# Altium PCB FR3068E-C_DEV1.4.PcbDoc (part 2 of 2)
Units mm, origin at the board's own origin, x right, y up, seen from the top; angles counter-clockwise.
Board outline 100 x 100 mm, 2 copper layers (Top Layer, Bottom Layer); 190 components, 181 nets, 704 pads, 626 vias.
Unrouted connection lines stored in the file: 147.
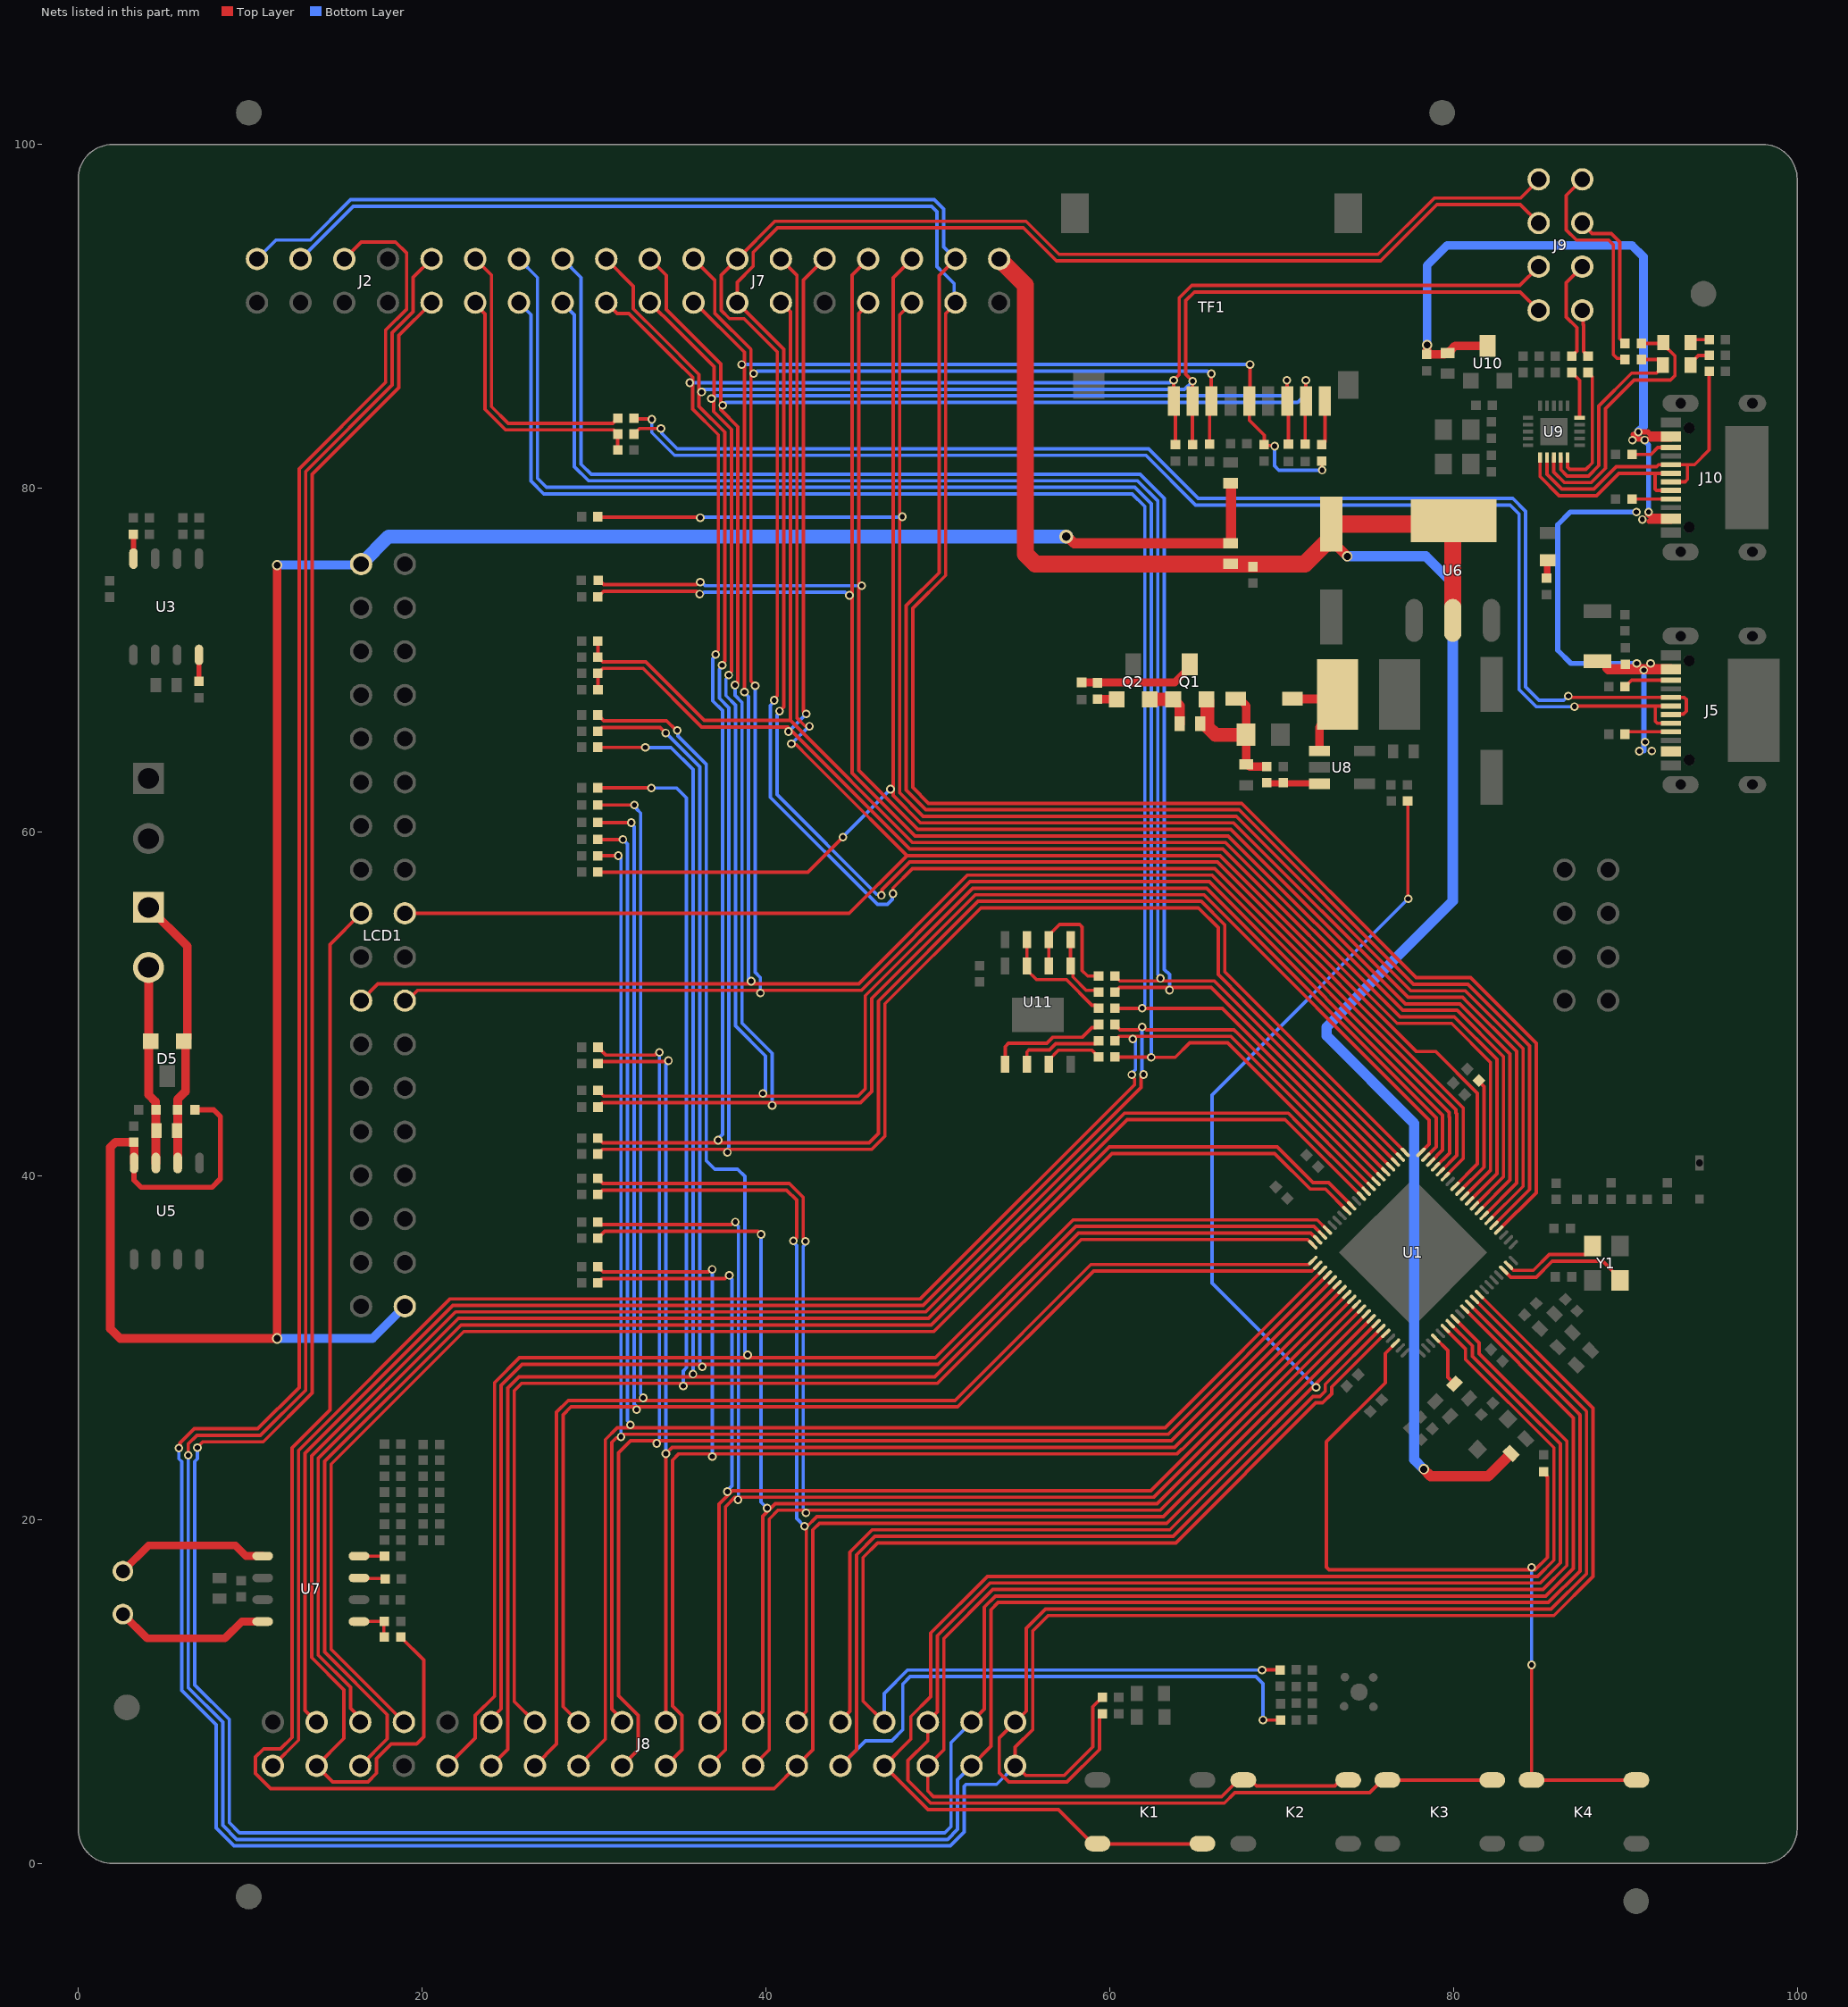
[diagram p2: the nets of this part, all layers, seen from the top]

## Via types
v1: diameter 0.5, hole 0.3, Top Layer to Bottom Layer, tented both sides, 618 vias
v2: diameter 0.6, hole 0.4, Top Layer to Bottom Layer, tented both sides, 7 vias
v3: diameter 0.8, hole 0.5, Top Layer to Bottom Layer, tented both sides, 1 vias

## Nets (pads, with @x,y where several pads share a name; then routed paths per layer and width w, separated by ;. In a path a pad name is that pad's centre, name@x,y a point inside that pad or via, vN(x,y) a via of type N, cw(c..) or ccw(c..) an arc to the next point about the centre after c; other vN are vias at no path point) (continued)
NetD6_1: D6.1 L3.2 U8.1 | length 6.5
  Top Layer w0.5: D6.1@70.65,67.75 73.01,67.75 L3.2@73.27,68.01 73.27,67.16 72.21,66.1 U8.1@72.21,64.72
NetD9_1: D9.1 R50.1 | length 1.1
  Top Layer w0.2: D9.1@93.81,88.483 93.973,88.646 R50.1@94.887,88.646
NetD10_1: D10.1 R51.1 | length 1.4
  Top Layer w0.2: D10.1@93.793,87.174 93.793,87.274 94.25,87.731 R51.1@94.887,87.731
NetD12_1: D12.1 R35.1 | length 1.1
  Top Layer w0.4: R35.1@85.424,74.765 85.454,74.795 85.454,75.778 D12.1@85.483,75.808
NetJ5_A5: J5.A5 R42.2 | length 2.7
  Top Layer w0.2: R42.2@89.989,65.695 90.128,65.834 J5.A5@92.653,65.834
NetJ5_A6: J5.A6 J5.B6 R49.2 | length 75.9
  Top Layer w0.2: R49.2@32.336,83.152 32.66,83.477 v1@33.902,83.477 ; v1(86.69,67.91) 86.771,67.91 86.847,67.834 J5.B6@92.653,67.834 93.432,67.834 93.549,67.717 93.549,67.03 93.38,66.861 92.68,66.861 J5.A6@92.653,66.834
  Bottom Layer w0.2: v1(33.902,83.475) 33.96,83.417 33.96,83.191 34.851,82.299 62.274,82.299 65.165,79.409 83.459,79.409 84.201,78.666 84.201,68.454 84.984,67.67 86.423,67.67 86.662,67.91 v1(86.69,67.91)
NetJ5_A7: J5.A7 J5.B7 R48.2 | length 75.5
  Top Layer w0.2: R48.2@32.336,84.072 32.367,84.041 33.339,84.041 v1(33.37,84.01) ; v1@87.042,67.334 J5.A7@92.653,67.334 ; 91.75,67.28 91.75,66.455 91.871,66.334 J5.B7@92.653,66.334
  Bottom Layer w0.2: v1(33.37,84.01) 33.368,84.008 33.368,83.245 34.694,81.919 62.117,81.919 65.007,79.029 83.302,79.029 83.821,78.509 83.821,68.296 84.827,67.29 87.034,67.29 v1(87.042,67.298)
NetJ5_B5: J5.B5 R44.2 | length 2.8
  Top Layer w0.2: R44.2@89.989,68.452 90.371,68.834 J5.B5@92.653,68.834
NetJ9_1: J9.1 R52.1 | length 13.6
  Top Layer w0.2: J9.1@87.504,97.973 86.574,97.043 86.574,95.032 87.165,94.441 89.032,94.441 89.31,94.163 89.31,87.773 89.527,87.556 89.92,87.556 R52.1@89.985,87.492
NetJ9_3: J9.3 R53.1 | length 8.7
  Top Layer w0.2: J9.3@87.504,95.433 87.504,95.387 88.07,94.821 89.189,94.821 89.69,94.321 89.69,88.722 R53.1@89.983,88.429
NetJ9_5: J9.5 R54.1 | length 6
  Top Layer w0.2: R54.1@86.893,87.69 87.195,87.992 87.195,89.347 86.574,89.968 86.574,91.963 J9.5@87.504,92.893
NetJ9_7: J9.7 R55.1 | length 2.8
  Top Layer w0.2: J9.7@87.504,90.353 87.559,90.298 87.559,89.52 87.575,89.505 87.575,87.955 R55.1@87.841,87.69
NetJ10_A5: J10.A5 R9.2 | length 2.3
  Top Layer w0.2: R9.2@90.393,79.268 90.499,79.374 J10.A5@92.653,79.374
NetJ10_B5: J10.B5 R13.2 | length 2.4
  Top Layer w0.2: R13.2@90.395,81.97 91.497,81.97 91.9,82.373 92.652,82.373 J10.B5@92.653,82.374
NetL2_2: L2.2 U1.64 | length 3.1
  Top Layer w0.2: U1.64@78.967,30.554 79.688,29.833 79.688,28.28 L2.2@80.064,27.904
NetQ1_1: Q1.1 Q2.2 R91.1 | length 2.9
  Top Layer w0.6: Q1.1@63.701,67.721 64.084,67.338 R91.1@64.084,66.301
  Top Layer w0.8: Q2.2@62.349,67.721 Q1.1@63.701,67.721
NetQ1_3: Q1.3 R15.2 R92.1 | length 6.8
  Top Layer w0.25: R15.2@58.374,68.709 R15.2@58.387,68.696
  Top Layer w0.45: R15.2@58.374,68.709 63.799,68.709 64.666,69.575 Q1.3@64.666,69.753
NetQ2_1: Q2.1 R92.2 | length 1.1
  Top Layer w0.5: R92.2@59.301,67.734 59.307,67.727 60.412,67.727 Q2.1@60.418,67.721
NetR6_2: R6.2 U1.12 | length 7.1
  Top Layer w0.2: U1.12@80.382,39.11 81.778,40.506 81.778,45.189 81.485,45.481 R6.2@81.485,45.544
NetR26_2: R26.2 U3.8 | length 1.5
  Top Layer w0.3: U3.8@7.026,70.309 7.027,70.308 R26.2@7.028,68.772 R26.2@7.028,68.772
NetR31_1: R31.1 U3.4 | length 1.4
  Top Layer w0.3: U3.4@3.216,75.909 3.219,75.913 3.219,77.28 R31.1@3.223,77.284
NetR40_2: R40.2 U7.3 | length 1.5
  Top Layer w0.2: U7.3@16.335,16.613 16.367,16.58 17.792,16.58 R40.2@17.825,16.548
NetR41_2: R41.2 U7.4 | length 1.5
  Top Layer w0.2: U7.4@16.335,17.883 16.342,17.875 17.787,17.875 R41.2@17.795,17.868
NetR46_1: R46.1 R47.2 U8.3 | length 3.1
  Top Layer w0.35: R46.1@69.15,62.865 69.172,62.842 72.187,62.842 U8.3@72.21,62.82
NetU1_78: U1.78 Y1.1 | length 7.8
  Top Layer w0.2: U1.78@82.927,34.513 83.338,34.102 84.82,34.102 85.748,35.03 88.698,35.03 89.698,34.03 Y1.1@89.698,33.93
NetU1_79: U1.79 Y1.3 | length 5.7
  Top Layer w0.2: U1.79@83.21,34.796 83.504,34.502 84.655,34.502 85.582,35.43 87.698,35.43 88.098,35.83 Y1.3@88.098,35.93
PA0/RX: D10.2 R52.2 U9.9 | length 13
  Top Layer w0.2: U9.9@86.246,81.8 86.246,81.089 86.621,80.714 87.857,80.714 88.466,81.322 88.466,84.795 90.372,86.702 91.822,86.702 92.193,87.074 92.193,87.242 91.943,87.492 R52.2@90.935,87.492
PA1/TX: D9.2 R53.2 U9.8 | length 16.2
  Top Layer w0.2: U9.8@85.846,81.8 85.846,80.951 86.464,80.334 88.015,80.334 88.85,81.169 88.85,83.096 ; 88.846,83.096 88.846,84.638 90.509,86.301 92.631,86.301 92.895,86.565 92.895,87.698 D9.2@92.21,88.383 ; R53.2@90.933,88.429 92.156,88.429 D9.2@92.21,88.483
PA4: J2.10 J8.4 U1.70 | length 205.9
  Top Layer w0.2: v1(6.936,24.187) 6.936,24.222 7.245,24.531 10.765,24.531 13.612,27.378 13.612,80.812 18.649,85.848 18.649,88.889 J2.10@20.56,90.8 ; J8.4@51.97,8.223 52.721,8.974 52.721,14.916 53.364,15.559 85.377,15.559 86.988,17.171 86.988,25.927 U1.70@80.664,32.251
  Bottom Layer w0.2: v1(6.936,24.187) 6.936,23.539 6.779,23.383 6.779,10.389 8.793,8.376 8.793,2.374 9.386,1.78 50.416,1.78 50.777,2.142 50.777,7.03 J8.4@51.97,8.223
PA4/USB_DP: J10.A6 J10.B6 R56.2 U9.7 | length 18.2
  Top Layer w0.2: U9.7@85.446,81.8 85.446,80.814 86.306,79.954 88.172,79.954 89.472,81.254 91.819,81.254 91.939,81.374 J10.B6@92.653,81.374 94.033,81.374 94.887,82.228 R56.2@94.887,86.807 ; J10.A6@92.653,80.374 93.473,80.374 93.617,80.517 93.617,81.37
PA5: J2.9 J8.3 U1.71 | length 210.3
  Top Layer w0.2: v1(6.399,23.752) 6.399,24.408 6.902,24.911 10.608,24.911 13.232,27.535 13.232,80.969 18.269,86.006 18.269,89.046 19.49,90.268 19.49,92.27 J2.9@20.56,93.34 ; J8.3@51.97,5.683 53.101,6.814 53.101,14.759 53.522,15.179 85.534,15.179 87.368,17.013 87.368,26.084 87.348,26.104 87.348,26.133 81.241,32.239 U1.71@80.947,32.533
  Bottom Layer w0.2: v1(6.399,23.752) 6.399,10.232 8.413,8.219 8.413,2.216 9.229,1.4 50.573,1.4 51.157,1.984 51.157,4.87 J8.3@51.97,5.683
PA5/USB_DM: J10.A7 J10.B7 U9.6 | length 11.6
  Top Layer w0.2: U9.6@85.046,81.8 85.046,80.676 86.149,79.574 88.33,79.574 89.63,80.874 91.752,80.874 ; J10.B7@92.653,79.874 91.815,79.874 91.737,79.952 91.737,80.858 91.752,80.874 ; J10.A7@92.653,80.874 91.752,80.874
PA6: J8.2 R7.2 U1.72 | length 70.6
  Top Layer w0.2: R7.2@59.584,8.716 59.409,8.541 59.409,6.627 57.525,4.743 54.134,4.743 53.58,5.297 53.58,7.293 55.15,8.863 55.15,13.682 56.267,14.799 85.691,14.799 87.748,16.856 87.748,26.298 U1.72@81.23,32.816
PA7: J2.5 J8.1 R8.2 U1.73 | length 224.8
  Top Layer w0.2: v1(5.86,24.17) 5.917,24.227 5.917,24.463 6.745,25.291 10.45,25.291 12.852,27.692 12.852,81.126 17.889,86.163 17.889,89.204 19.11,90.425 19.11,93.677 18.46,94.327 16.467,94.327 J2.5@15.48,93.34 ; R8.2@59.584,9.673 59.029,9.118 59.029,6.785 57.367,5.123 55.128,5.123 54.569,5.683 J8.1@54.51,5.683 54.51,6.766 55.53,7.786 55.53,13.524 56.424,14.419 85.849,14.419 88.128,16.698 88.128,26.484 87.988,26.624 U1.73@81.513,33.099
  Bottom Layer w0.2: v1(5.86,24.17) 5.86,23.542 6.019,23.383 6.019,10.075 8.033,8.061 8.033,2.059 9.071,1.02 50.731,1.02 51.537,1.827 51.537,4.485 51.654,4.603 53.43,4.603 J8.1@54.51,5.683
PA10: J2.3 J7.3 U1.4 | length 127.6
  Top Layer w0.2: J7.3@51.04,90.8 51.04,90.743 50.464,90.167 50.464,74.93 48.549,73.015 48.549,62.599 49.472,61.675 67.691,61.675 77.836,51.53 81.004,51.53 84.818,47.717 84.818,39.02 U1.4@82.644,36.847
  Bottom Layer w0.2: J2.3@12.94,93.34 16.005,96.405 49.639,96.405 49.96,96.084 49.96,92.893 50.362,92.49 50.367,92.49 50.958,91.9 50.958,90.882 J7.3@51.04,90.8
PA11: J2.1 J7.4 U1.5 | length 130.6
  Top Layer w0.2: J7.4@51.04,93.34 50.084,92.384 50.084,75.088 48.169,73.173 48.169,62.442 49.315,61.295 67.533,61.295 77.679,51.15 80.847,51.15 84.438,47.559 84.438,39.206 U1.5@82.361,37.13
  Bottom Layer w0.2: J2.1@10.4,93.34 11.503,94.443 13.505,94.443 15.848,96.785 49.796,96.785 50.34,96.241 50.34,94.04 J7.4@51.04,93.34
PA12: J7.5 R69.1 U1.6 | length 99.9
  Top Layer w0.2: R69.1@30.235,78.346 30.264,78.318 36.159,78.318 v1(36.188,78.289) ; J7.5@48.5,90.8 47.789,90.089 47.789,62.284 49.158,60.915 67.376,60.915 77.521,50.77 80.689,50.77 84.058,47.402 84.058,39.392 U1.6@82.079,37.412
  Bottom Layer w0.2: v1(36.188,78.289) 36.218,78.319 47.985,78.319 v1@48.011,78.345
  other v1: 47.94,78.35
PA13: J7.6 R78.2 U1.7 | length 103.5
  Top Layer w0.2: R78.2@30.235,57.67 42.454,57.67 44.484,59.7 v1(44.484,59.708) ; J7.6@48.5,93.34 47.409,92.249 47.409,62.127 49,60.535 67.219,60.535 77.364,50.39 80.532,50.39 80.805,50.117 83.678,47.244 83.678,39.577 U1.7@81.796,37.695
  Bottom Layer w0.2: v1(44.484,59.708) 44.484,59.718 47.256,62.49 v1(47.256,62.5)
PA14: J7.7 R14.1 U1.8 | length 97.6
  Top Layer w0.2: R14.1@30.301,74.678 30.584,74.395 35.963,74.395 36.105,74.538 v1(36.186,74.538) ; J7.7@45.96,90.8 45.96,90.722 45.41,90.172 45.41,63.588 48.843,60.155 67.061,60.155 77.206,50.01 80.375,50.01 83.298,47.087 83.298,39.763 U1.8@81.513,37.978
  Bottom Layer w0.2: v1(36.186,74.538) 36.267,74.538 36.474,74.332 v1(45.581,74.332) v1@45.583,74.333
PA15: J7.8 R3.1 U1.9 | length 99.3
  Top Layer w0.2: R3.1@30.276,73.725 30.567,74.015 35.99,74.015 v1(36.158,73.848) ; J7.8@45.96,93.34 45.03,92.41 45.03,63.431 48.685,59.775 66.904,59.775 77.049,49.63 80.217,49.63 82.918,46.93 82.918,39.949 U1.9@81.23,38.261
  Bottom Layer w0.2: v1(36.158,73.848) 36.215,73.905 36.379,73.905 36.425,73.952 44.611,73.952 44.785,73.778 v1(44.866,73.778)
PA_EN: R20.2 R43.2 U7.1 | length 2.3
  Top Layer w0.2: U7.1@16.335,14.073 16.342,14.08 17.777,14.08 17.785,14.088 R20.2@17.785,13.198
PB0: J7.11 R2.2 R34.1 U1.10 | length 96.4
  Top Layer w0.2: R34.1@30.237,71.103 30.237,70.184 R2.2@30.235,70.182 30.514,69.903 33.02,69.903 36.43,66.493 41.43,66.493 ; J7.11@40.88,90.8 40.898,90.8 41.43,90.268 41.43,66.493 ; U1.10@80.947,38.544 82.538,40.135 82.538,46.772 80.06,49.25 76.892,49.25 66.746,59.395 48.528,59.395 41.43,66.493
PB1: J7.10 R4.2 R58.1 U1.11 | length 99.2
  Top Layer w0.2: R58.1@30.239,68.283 30.235,68.286 R4.2@30.235,69.237 30.522,69.523 32.863,69.523 36.273,66.113 41.273,66.113 48.371,59.015 66.589,59.015 76.734,48.87 79.902,48.87 82.158,46.615 82.158,40.32 U1.11@80.664,38.827 ; v1@42.19,67.025 42.19,92.11 J7.10@43.42,93.34
  Bottom Layer w0.2: v1@41.31,65.816 41.31,65.826 42.351,66.868 v1(42.351,66.878)
  other v1: 41.32,65.85
PB3: J7.12 LCD1.17 U1.13 | length 114.3
  Top Layer w0.2: LCD1.17@19,55.273 44.85,55.273 48.213,58.635 ; J7.12@40.88,93.34 41.81,92.41 41.81,66.651 v1@42.31,66.151 ; v1(41.49,65.14) 41.547,65.083 41.766,65.083 42.492,64.357 43.869,62.98 48.213,58.635 ; v1(42.538,66.159) 42.564,66.133 v1@42.643,66.133 ; U1.13@80.099,39.392 81.398,40.692 81.398,44.806 78.966,47.239 77.828,47.239 66.432,58.635 48.213,58.635
  Bottom Layer w0.2: v1(41.49,65.14) 41.504,65.14 42.523,66.159 v1(42.538,66.159)
PB4: J7.13 J9.4 U1.15 | length 135.8
  Top Layer w0.2: v1(40.802,67.039) 41.05,67.287 41.05,88.09 J7.13@38.34,90.8 38.34,91.996 39.27,92.926 39.27,93.733 40.688,95.151 54.986,95.151 56.908,93.229 75.773,93.229 79.045,96.501 83.897,96.501 J9.4@84.964,95.433 ; v1(46.721,56.322) 46.768,56.37 46.768,56.653 48.371,58.255 49.792,58.255 66,58.255 66.274,58.255 80.578,43.952 80.578,43.677 80.579,43.676 80.579,41.004 U1.15@79.533,39.958
  Bottom Layer w0.2: v1(40.802,67.039) 40.802,66.958 40.652,66.808 40.652,62.179 46.451,56.38 46.663,56.38 v1(46.721,56.322)
PB5: J7.14 J9.2 U1.16 | length 137.4
  Top Layer w0.2: v1(40.49,67.67) 40.49,67.751 40.67,67.931 40.67,87.933 38.733,89.87 37.887,89.87 37.41,90.348 37.41,92.41 J7.14@38.34,93.34 40.531,95.531 55.144,95.531 57.066,93.609 75.616,93.609 78.888,96.881 83.902,96.881 84.964,97.943 J9.2@84.964,97.973 ; v1(47.399,56.417) 47.397,56.418 47.397,56.745 48.528,57.875 66.117,57.875 80.156,43.837 80.156,43.668 80.198,43.625 80.198,41.189 U1.16@79.25,40.241
  Bottom Layer w0.2: v1(40.49,67.67) 40.49,67.589 40.272,67.371 40.272,62.021 46.501,55.792 47.083,55.792 47.364,56.073 47.364,56.383 v1(47.399,56.417)
PB6: J7.15 LCD1.22 R22.1 R23.2 TF1.5 U1.17 | length 156.1
  Top Layer w0.2: LCD1.22@16.46,50.193 17.439,51.172 45.405,51.172 51.728,57.495 65.959,57.495 79.758,43.697 79.758,43.431 79.776,43.413 79.776,41.332 U1.17@78.967,40.524 ; J7.15@35.8,90.8 35.883,90.8 38.76,87.923 38.76,68.322 v1@38.762,68.32 ; v1(68.17,87.2) 68.17,85.121 TF1.5@68.13,85.081 68.13,83.958 69,83.088 R22.1@69,82.534 69.041,82.493 69.563,82.493 v1(69.604,82.452) ; R23.2@72.349,81.584 72.355,81.578 72.355,81.061 v1(72.362,81.055)
  Bottom Layer w0.2: v1@38.523,87.197 38.526,87.2 39.51,87.2 ; v1(38.76,68.15) 38.76,68.13 39,67.89 v1@39,51.352 ; 39.51,87.2 v1(68.17,87.2) ; v1(69.604,82.452) 69.604,81.3 69.849,81.055 v1(72.362,81.055)
  other v1: 39.15,51.33 38.6,87.2
PB7: J7.16 LCD1.21 R16.1 TF1.3 U1.18 | length 147.1
  Top Layer w0.2: LCD1.21@19,50.193 19.145,50.193 19.744,50.792 45.562,50.792 51.886,57.115 65.802,57.115 79.378,43.54 79.378,41.5 U1.18@78.685,40.807 ; J7.16@35.8,93.34 37.03,92.11 37.03,90.19 39.14,88.08 39.14,68.779 39.383,68.536 v1(39.383,68.512) ; R16.1@65.823,82.563 65.823,84.974 TF1.3@65.93,85.081 65.92,85.092 v1(65.92,86.66)
  Bottom Layer w0.2: v1(39.29,86.67) 39.371,86.67 39.521,86.82 65.679,86.82 65.839,86.66 v1(65.92,86.66) ; v1@39.38,68.509 39.38,51.85 39.68,51.55 39.68,50.687 v1@39.685,50.682
  other v1: 39.69,50.64
PB8: J7.17 R19.1 R82.2 TF1.7 U1.19 | length 151.8
  Top Layer w0.2: R82.2@30.238,44.965 30.569,44.634 45.359,44.634 45.792,45.067 45.792,50.484 52.043,56.735 65.645,56.735 78.998,43.382 78.998,41.686 U1.19@78.402,41.089 ; J7.17@33.26,90.8 34.755,89.305 34.762,89.305 36.998,87.069 v1@36.998,85.326 ; v1@36.962,85.22 36.962,84.464 38,83.427 38,69.366 ; v1(70.32,86.28) 70.32,85.092 70.405,85.007 R19.1@70.405,82.559
  Bottom Layer w0.2: v1(36.84,85.22) 36.921,85.22 37.082,85.38 48.829,85.38 70.135,85.38 70.32,85.565 v1(70.32,86.28) ; 37.68,68.884 37.68,67.943 38.24,67.383 38.24,48.725 39.988,46.977 39.988,44.818 v1@39.844,44.674
  other v1: 39.83,44.79 37.847,69.132
PB9: J7.18 R24.1 R81.1 TF1.8 U1.20 | length 155.2
  Top Layer w0.2: R81.1@30.238,44 30.493,44.254 45.516,44.254 46.172,44.91 46.172,50.327 52.201,56.355 65.487,56.355 78.598,43.245 78.598,41.851 U1.20@78.119,41.372 ; J7.18@33.26,93.34 34.212,92.388 34.212,90.393 37.378,87.227 37.378,84.585 38.38,83.584 38.38,68.673 v1@38.28,68.574 ; R24.1@71.377,82.559 71.377,85.08 71.42,85.123 v1(71.42,86.28)
  Bottom Layer w0.2: v1(37.492,84.827) 37.665,85 70.942,85 71.42,85.478 v1(71.42,86.28) ; v1(38.21,68.55) 38.21,67.95 38.62,67.54 38.62,48.882 40.368,47.135 v1@40.368,44.032
  other v1: 40.37,44.1
PB10: J7.19 J9.6 R29.1 R84.2 TF1.1 U1.21 | length 175.9
  Top Layer w0.2: R84.2@30.235,42.202 30.514,41.922 46.007,41.922 46.552,42.468 46.552,50.169 52.358,55.975 65.33,55.975 66.706,54.599 66.706,51.866 U1.21@77.2,41.372 ; J7.19@30.72,90.8 31.354,90.166 32.041,90.166 34.709,87.498 35.74,86.467 35.74,84.611 37.24,83.112 37.24,70.563 37.089,70.412 v1(37.089,70.331) ; R29.1@63.834,82.538 63.834,84.978 TF1.1@63.73,85.081 v1(63.73,86.29) 64.052,86.611 64.052,91.072 64.778,91.799 83.87,91.799 J9.6@84.964,92.893
  Bottom Layer w0.2: v1(35.581,86.14) 63.499,86.14 63.649,86.29 v1(63.73,86.29) ; v1(37.089,70.331) 37.089,70.25 36.92,70.081 36.92,67.628 37.48,67.068 37.48,42.411 37.23,42.161 v1(37.23,42.08)
PB11: J7.20 J9.8 R30.1 R83.1 TF1.2 U1.22 | length 178.5
  Top Layer w0.2: R83.1@30.235,41.274 30.504,41.542 46.164,41.542 46.932,42.31 46.932,50.012 52.515,55.595 65.172,55.595 66.326,54.442 66.326,51.708 67.816,50.218 67.816,50.19 U1.22@76.917,41.089 ; J7.20@30.72,93.34 32.301,91.759 32.301,90.444 33.836,88.909 36.12,86.625 36.12,84.769 37.62,83.269 37.62,69.951 37.46,69.791 v1(37.46,69.71) ; R30.1@64.828,82.538 TF1.2@64.828,85.08 ; TF1.2@64.83,85.081 v1(64.83,86.23) 64.432,86.628 64.432,90.915 64.935,91.419 83.899,91.419 J9.8@84.964,90.353
  Bottom Layer w0.2: v1@36.27,85.76 64.36,85.76 v1(64.83,86.23) ; v1(37.46,69.71) 37.46,69.629 37.3,69.469 37.3,67.786 37.86,67.226 37.86,41.637 37.827,41.605 37.827,41.427 v1(37.77,41.37)
  other v1: 36.27,85.6
PB12: J7.21 R36.2 U1.23 | length 93.2
  Top Layer w0.2: R36.2@60.313,51.625 60.598,51.34 66.101,51.34 U1.23@76.634,40.807
  Bottom Layer w0.2: J7.21@28.18,90.8 28.18,90.78 28.865,90.095 28.865,81.261 29.686,80.439 61.63,80.439 62.81,79.259 62.81,51.721 62.96,51.571 v1(62.96,51.49)
PB13: J7.22 R60.2 U1.24 | length 96.3
  Top Layer w0.2: R60.2@60.313,50.685 60.588,50.96 65.915,50.96 U1.24@76.351,40.524
  Bottom Layer w0.2: J7.22@28.18,93.34 29.26,92.26 29.26,81.403 29.844,80.819 61.788,80.819 63.19,79.417 63.19,52.01 63.49,51.71 v1(63.49,50.81)
PB14: J7.23 R61.2 U1.25 | length 95.9
  Top Layer w0.2: R61.2@60.313,49.745 66.564,49.745 U1.25@76.068,40.241
  Bottom Layer w0.2: J7.23@25.64,90.8 26.34,90.1 26.34,80.422 27.083,79.679 61.315,79.679 62.05,78.945 62.05,49.934 61.9,49.784 v1(61.9,49.75)
PB15: J7.24 R62.2 U1.28 | length 100.5
  Top Layer w0.2: R62.2@60.308,46.92 60.317,46.911 62.409,46.911 v1(62.423,46.897) 63.817,46.897 64.66,47.74 66.872,47.74 70.17,44.442 U1.28@75.22,39.392
  Bottom Layer w0.2: J7.24@25.64,93.34 26.72,92.26 26.72,80.58 27.241,80.059 61.473,80.059 62.43,79.102 62.43,46.904 v1(62.423,46.897)
PC0: J8.35 R63.2 U1.27 | length 98.1
  Top Layer w0.2: J8.35@11.33,5.683 12.819,7.172 12.819,24.019 21.646,32.846 48.994,32.846 61.455,45.307 61.455,45.643 61.29,45.809 v1(61.29,45.89) ; R63.2@60.313,47.865 60.568,48.12 67.058,48.12 U1.27@75.503,39.675
  Bottom Layer w0.2: v1(61.29,45.89) 61.29,45.961 61.509,46.18 61.509,47.916 v1@61.386,48.039
  other v1: 61.35,47.96
PC1: J8.34 R64.2 U1.26 | length 96.2
  Top Layer w0.2: J8.34@13.87,8.223 13.87,8.225 13.199,8.895 13.199,23.861 21.803,32.466 49.151,32.466 61.835,45.15 61.835,45.757 v1(61.978,45.899) ; R64.2@60.313,48.805 60.618,48.5 61.659,48.5 v1@61.819,48.66 ; v1(61.9,48.66) 61.981,48.66 62.141,48.5 67.243,48.5 67.483,48.261 U1.26@75.785,39.958
  Bottom Layer w0.2: v1(61.9,48.66) 61.889,48.649 61.889,46.069 61.978,45.981 v1(61.978,45.899)
PC2: J8.33 R20.1 U1.29 | length 105.5
  Top Layer w0.2: R20.1@18.76,13.174 20.098,11.836 20.098,7.369 19.682,6.953 18.217,6.953 17.357,6.093 17.357,5.247 16.853,4.743 14.809,4.743 J8.33@13.87,5.683 15.462,7.275 15.462,10.098 13.579,11.981 13.579,12.718 13.579,23.704 21.961,32.086 49.308,32.086 60.873,43.65 70.396,43.65 70.951,43.096 U1.29@74.937,39.11
PC3: J8.32 U1.30 | length 87
  Top Layer w0.2: J8.32@16.41,8.223 16.41,8.459 15.842,9.027 15.842,10.256 13.959,12.138 13.959,23.546 22.118,31.706 49.466,31.706 61.03,43.27 70.211,43.27 U1.30@74.654,38.827
PC4: J8.31 U1.32 | length 88.6
  Top Layer w0.2: J8.31@16.41,5.683 17.978,7.251 17.978,8.657 14.339,12.296 14.339,23.389 22.276,31.326 49.623,31.326 59.985,41.688 69.76,41.688 71.838,39.61 72.739,39.61 U1.32@74.088,38.261
PC5: J8.30 U1.33 | length 84.7
  Top Layer w0.2: J8.30@18.95,8.223 14.719,12.453 14.719,23.232 22.433,30.946 49.781,30.946 60.142,41.308 69.603,41.308 71.681,39.23 72.554,39.23 U1.33@73.806,37.978
PC7/SWDIO: R55.2 U9.10 | length 7.6
  Top Layer w0.2: U9.10@86.646,81.8 86.646,81.226 86.778,81.094 87.7,81.094 88.086,81.48 88.086,86.495 R55.2@87.841,86.74
PD0: J8.27 R70.2 U1.37 | length 119.8
  Top Layer w0.2: J8.27@21.49,5.683 23.1,7.293 23.1,8.608 24.226,9.734 24.226,27.975 25.674,29.422 49.87,29.422 57.887,37.44 72.081,37.44 U1.37@72.674,36.847 ; R70.2@30.235,66.81 30.572,66.473 34.227,66.473 34.779,65.921 v1(34.851,65.921)
  Bottom Layer w0.2: v1(34.851,65.921) 34.898,65.874 34.898,65.59 36.536,63.952 36.536,40.893 37.031,40.398 38.357,40.398 38.79,39.965 38.79,29.755 38.94,29.605 v1(38.94,29.58)
PD1: J8.26 R71.1 U1.38 | length 113.5
  Top Layer w0.2: J8.26@24.03,8.223 24.03,8.414 24.606,8.99 24.606,27.817 25.831,29.042 50.027,29.042 58.045,37.06 71.895,37.06 U1.38@72.391,36.564 ; R71.1@30.235,65.867 30.461,66.093 33.86,66.093 34.182,65.771 v1(34.182,65.769)
  Bottom Layer w0.2: v1(34.182,65.769) 36.156,63.795 36.156,29.098 v1@36.311,28.943
  other v1: 36.31,28.89
PD2: J8.25 R72.2 U1.39 | length 114.6
  Top Layer w0.2: J8.25@24.03,5.683 24.986,6.639 24.986,27.654 25.643,28.311 49.833,28.311 58.202,36.68 71.71,36.68 U1.39@72.108,36.281 ; R72.2@30.235,64.941 30.244,64.932 32.988,64.932 v1(32.997,64.923)
  Bottom Layer w0.2: v1(32.997,64.923) 34.491,64.923 35.77,63.643 v1(35.77,28.47)
PD3: J8.24 R73.1 U1.40 | length 109.7
  Top Layer w0.2: J8.24@26.57,8.223 25.366,9.426 25.366,27.497 25.801,27.931 35.23,27.931 49.991,27.931 58.359,36.3 71.524,36.3 U1.40@71.826,35.998 ; R73.1@30.235,62.575 30.24,62.57 33.345,62.57 v1(33.35,62.565)
  Bottom Layer w0.2: J8.24@26.57,8.223 J8.24@26.63,8.223 ; v1(33.35,62.565) 34.817,62.565 35.39,61.992 35.39,28.84 35.197,28.647 v1@35.197,27.819
  other v1: 35.203,27.781
PD4: J8.23 R74.2 U1.41 | length 105.6
  Top Layer w0.2: J8.23@26.57,5.683 27.831,6.944 27.831,26.26 28.512,26.94 32.87,26.94 51.011,26.94 58.911,34.84 71.587,34.84 U1.41@71.826,35.079 ; R74.2@30.235,61.579 v1(32.36,61.579)
  Bottom Layer w0.2: v1(32.36,61.579) 32.36,61.498 32.494,61.364 32.494,61.336 32.72,61.11 32.72,27.321 32.87,27.171 v1(32.87,27.09)
PD5: J8.22 R75.1 U1.42 | length 102
  Top Layer w0.2: J8.22@29.11,8.223 28.211,9.121 28.211,26.102 28.669,26.56 32.49,26.56 51.169,26.56 59.069,34.46 71.772,34.46 U1.42@72.108,34.796 ; R75.1@30.235,60.568 30.244,60.559 32.171,60.559 v1(32.18,60.55)
  Bottom Layer w0.2: J8.22@28.9,8.223 J8.22@29.11,8.223 ; v1(32.18,60.55) 32.18,60.469 32.34,60.309 32.34,59.458 32.34,27.164 32.34,26.72 v1@32.5,26.56
  other v1: 32.49,26.4
PD6: J8.21 R76.2 U1.43 | length 101.1
  Top Layer w0.2: J8.21@29.11,5.683 30.67,7.243 30.67,24.659 31.36,25.35 32.13,25.35 63.228,25.35 U1.43@72.391,34.513 ; R76.2@30.235,59.572 30.236,59.571 31.689,59.571 v1(31.69,59.57)
  Bottom Layer w0.2: v1(31.69,59.57) 31.96,59.3 31.96,25.751 32.12,25.591 v1(32.12,25.51)
PD7: J8.20 R77.1 U1.44 | length 97.2
  Top Layer w0.2: R77.1@30.235,58.62 30.24,58.625 31.415,58.625 v1(31.42,58.63) ; v1(31.58,24.82) 31.523,24.763 31.31,24.763 31.05,24.502 31.05,8.98 31.65,8.38 J8.20@31.65,8.223 ; v1@31.58,24.97 32.5,24.97 63.414,24.97 U1.44@72.674,34.23
  Bottom Layer w0.2: v1(31.42,58.63) 31.43,58.63 31.58,58.48 v1(31.58,24.82)
PD7/SWCLK: R54.2 U9.15 | length 2.8
  Top Layer w0.2: R54.2@86.893,86.74 87.346,86.287 U9.15@87.346,84.1
PD8: J8.19 R80.2 U1.45 | length 91.4
  Top Layer w0.2: R80.2@30.238,47.483 30.623,47.098 30.629,47.098 30.703,47.024 33.543,47.024 33.642,47.123 33.753,47.123 v1(33.81,47.18) ; J8.19@31.65,5.683 32.58,6.613 32.58,8.613 31.43,9.763 31.43,23.887 32.132,24.59 33.347,24.59 63.599,24.59 U1.45@72.957,33.948
  Bottom Layer w0.2: v1(33.66,24.44) 33.66,24.521 33.81,24.671 33.81,24.707 ; 33.81,24.707 v1(33.81,47.18)
PD9: J8.18 R79.1 U1.46 | length 85.8
  Top Layer w0.2: R79.1@30.238,46.543 30.338,46.644 34.284,46.644 v1(34.34,46.7) ; J8.18@34.19,8.223 v1(34.19,23.84) 34.56,24.21 63.785,24.21 U1.46@73.24,33.665
  Bottom Layer w0.2: v1(34.19,23.84) 34.189,23.841 34.189,24.219 34.19,24.22 34.19,24.66 34.19,46.433 34.19,46.469 34.34,46.619 v1(34.34,46.7)
PD10: J8.17 R89.2 U1.47 | length 79.1
  Top Layer w0.2: R89.2@30.235,34.71 30.535,34.41 36.65,34.41 36.805,34.565 v1(36.886,34.565) ; J8.17@34.19,5.683 35.12,6.613 35.12,8.608 34.57,9.158 34.57,23.462 34.938,23.83 63.942,23.83 64.206,24.093 64.234,24.093 U1.47@73.523,33.382
  Bottom Layer w0.2: v1@36.886,23.756 v1(36.886,34.565)
  other v1: 36.89,23.67
PD11: J8.16 R90.1 U1.48 | length 75.1
  Top Layer w0.2: R90.1@30.235,33.782 30.483,34.03 37.613,34.03 37.736,34.153 37.823,34.153 v1(37.88,34.21) ; J8.16@36.73,8.223 36.73,8.3 37.28,8.85 37.28,20.909 38.06,21.69 62.397,21.69 U1.48@73.806,33.099
  Bottom Layer w0.2: v1(37.768,21.634) 37.768,21.715 38.03,21.977 38.03,33.979 37.88,34.129 v1(37.88,34.21)
PD12: J8.15 R87.2 U1.49 | length 81.2
  Top Layer w0.2: R87.2@30.235,37.31 30.381,37.164 37.993,37.164 38.149,37.32 v1(38.23,37.32) ; J8.15@36.73,5.683 37.66,6.613 37.66,20.752 38.218,21.31 62.582,21.31 68.822,27.55 U1.49@74.088,32.816
  Bottom Layer w0.2: v1(38.23,37.32) 38.23,37.239 38.41,37.059 38.41,21.19 v1(38.38,21.16)
PD13: J8.14 R88.1 U1.50 | length 77.7
  Top Layer w0.2: R88.1@30.235,36.384 30.635,36.784 39.541,36.784 v1(39.726,36.599) ; J8.14@39.27,8.223 39.27,8.293 39.823,8.847 39.823,20.194 40.56,20.93 62.768,20.93 U1.50@74.371,32.533
  Bottom Layer w0.2: v1(39.726,36.599) 39.726,21.024 v1(40.08,20.67)
PD14: J8.13 R86.2 U1.51 | length 84.9
  Top Layer w0.2: R86.2@30.235,39.85 30.528,39.557 41.369,39.557 42.176,38.75 v1@42.176,36.378 ; J8.13@39.27,5.683 40.203,6.616 40.203,20.036 40.717,20.55 62.954,20.55 U1.51@74.654,32.251
  Bottom Layer w0.2: v1(42.31,36.19) 42.253,36.133 42.253,35.977 42.181,35.906 42.181,20.547 v1@42.335,20.393
  other v1: 42.34,20.4
PD15: J8.12 R85.1 U1.52 | length 80.5
  Top Layer w0.2: R85.1@30.235,38.92 30.492,39.177 41.212,39.177 41.796,38.593 41.796,36.418 v1(41.601,36.223) ; J8.12@41.81,8.223 41.81,8.297 42.361,8.849 42.361,19.565 42.967,20.17 63.139,20.17 U1.52@74.937,31.968
  Bottom Layer w0.2: v1(41.601,36.223) 41.601,36.142 41.801,35.941 41.801,20.069 v1(42.25,19.62)
PP0: J8.7 K1.1 U1.66 | length 83.3
  Top Layer w0.2: K1.1@59.3,1.133 65.38,1.133 K1.1@65.4,1.153 ; K1.1@59.3,1.153 59,1.153 57.02,3.133 49.44,3.133 J8.7@46.89,5.683 48.442,7.235 48.442,8.551 49.6,9.708 49.6,13.407 52.892,16.699 84.904,16.699 85.848,17.643 85.848,24.189 80.703,29.333 80.703,29.949 U1.66@79.533,31.119
PP2: J8.5 K2.1 U1.68 | length 89.6
  Top Layer w0.2: K2.1@73.883,4.853 73.466,4.853 73.116,4.503 68.55,4.503 68.2,4.853 67.483,4.853 66.523,3.893 49.754,3.893 49.43,4.217 J8.5@49.43,5.683 50.36,6.613 50.36,13.092 53.207,15.939 85.219,15.939 86.608,17.328 86.608,24.56 81.503,29.665 81.503,30.28 U1.68@80.099,31.685
PP3: J8.6 K3.1 U1.67 | length 98.9
  Top Layer w0.2: K3.1@75.75,4.853 K3.1@75.866,4.853 ; U1.67@79.816,31.402 81.103,30.115 81.103,29.499 85.107,25.495 ; K3.1@82.266,4.853 K3.1@76.166,4.853 K3.1@75.866,4.853 ; 85.122,25.509 86.228,24.403 86.228,17.485 85.062,16.319 53.049,16.319 49.98,13.249 49.98,8.815 49.43,8.265 J8.6@49.43,8.223 49.43,7.14 48.274,5.984 48.274,4.835 49.597,3.513 66.68,3.513 67.29,4.123 75.136,4.123 K3.1@75.866,4.853
PP4: J8.11 LCD1.18 U1.53 | length 137.2
  Top Layer w0.2: LCD1.18@16.46,55.273 14.645,53.458 14.645,26.382 12.439,24.176 12.439,7.329 11.777,6.667 10.79,6.667 10.318,6.196 10.318,5.236 11.192,4.363 40.49,4.363 J8.11@41.81,5.683 42.741,6.614 42.741,19.407 43.124,19.79 63.325,19.79 U1.53@75.22,31.685
PP5: J8.10 R45.2 U1.54 | length 87.6
  Top Layer w0.2: J8.10@44.35,8.223 44.35,8.3 44.9,8.85 44.9,18.112 46.198,19.41 63.511,19.41 U1.54@75.503,31.402 ; R45.2@77.341,61.82 77.357,61.804 77.357,56.133 v1(77.373,56.117)
  Bottom Layer w0.2: v1(72.018,27.703) 65.955,33.767 65.955,44.699 v1(77.373,56.117)
PP6: C24.2 J8.9 U1.55 | length 80.4
  Top Layer w0.2: J8.9@44.35,5.683 45.28,6.613 45.28,17.954 46.355,19.03 63.696,19.03 71.84,27.173 72.237,27.173 72.548,27.484 72.548,27.882 U1.55@75.785,31.119 ; v1(68.923,8.349) 68.926,8.345 69.939,8.345 C24.2@69.943,8.342
  Bottom Layer w0.2: J8.9@44.35,5.683 45.81,7.143 47.337,7.143 47.97,7.775 47.97,10.438 48.406,10.874 68.505,10.874 68.923,10.456 v1(68.923,8.349)
PP7: C23.2 J8.8 U1.56 | length 71.4
  Top Layer w0.2: J8.8@46.89,8.223 45.66,9.453 45.66,17.797 46.513,18.65 63.854,18.65 71.997,26.793 72.395,26.793 72.928,27.326 72.928,27.724 75.863,30.66 75.891,30.66 U1.56@76.068,30.836 ; v1(68.874,11.254) 68.879,11.258 69.93,11.258 C23.2@69.935,11.263
  Bottom Layer w0.2: J8.8@46.89,8.223 46.89,9.895 48.248,11.254 v1(68.874,11.254)
PSRAM-CLK: R36.1 U11.6 | length 7.7
  Top Layer w0.2: U11.6@56.466,52.214 U11.6@56.466,53.744 56.466,53.994 57.091,54.62 58.261,54.62 58.408,54.473 58.408,51.941 58.724,51.625 R36.1@59.363,51.625
PSRAM-CS: R64.1 U11.1 | length 7
  Top Layer w0.2: U11.1@53.926,46.494 53.926,47.524 54.111,47.709 56.355,47.709 56.717,48.07 58.421,48.07 58.981,48.63 59.188,48.63 R64.1@59.363,48.805
PSRAM-IO0: R60.1 U11.5 | length 4.1
  Top Layer w0.2: U11.5@57.736,53.744 U11.5@57.736,52.214 57.868,52.082 57.868,51.572 58.643,50.798 59.25,50.798 R60.1@59.363,50.685
PSRAM-IO1: R63.1 U11.2 | length 5.5
  Top Layer w0.2: U11.2@55.196,46.494 55.196,47.211 55.313,47.329 56.513,47.329 56.874,47.69 59.071,47.69 ; 59.071,47.69 R63.1@59.188,47.69 ; 59.071,47.69 R63.1@59.188,47.69 ; R63.1@59.188,47.69 R63.1@59.363,47.865 R63.1@59.188,47.69
PSRAM-IO2: R62.1 U11.3 | length 3.5
  Top Layer w0.2: U11.3@56.466,46.494 56.466,46.744 57.032,47.31 58.978,47.31 R62.1@59.363,46.925
PSRAM-IO3: R61.1 U11.7 | length 6.9
  Top Layer w0.2: U11.7@55.196,53.744 U11.7@55.196,52.214 55.196,51.964 55.745,51.415 57.488,51.415 58.983,49.92 59.188,49.92 R61.1@59.363,49.745
RS485_A1: D5.1 J3.1 R10.2 R37.1 U5.6 | length 16.1
  Top Layer w0.5: J3.1@4.09,55.622 6.353,53.359 6.353,48.028 D5.1@6.153,47.828 ; U5.6@5.789,40.749 5.789,44.462 6.237,44.909 D5.1@6.237,47.822
RS485_B1: D5.2 J3.2 R21.2 R37.2 U5.7 | length 11.5
  Top Layer w0.5: J3.2@4.09,52.122 4.105,52.107 4.105,44.715 4.502,44.318 4.502,43.848 R21.2@4.519,43.832 ; U5.7@4.519,40.749 R21.2@4.519,43.765
RSTN: K4.1 R1.2 U1.58 | length 51.5
  Top Layer w0.2: U1.58@76.634,30.271 76.038,29.675 76.038,27.955 72.615,24.532 72.615,17.238 72.774,17.079 84.747,17.079 85.468,17.8 85.468,22.488 85.425,22.53 85.425,22.605 R1.2@85.25,22.78 ; v1(84.55,11.551) K4.1@84.55,4.853 K4.1@90.65,4.853
  Bottom Layer w0.2: v1@84.542,17.26 84.55,17.252 v1(84.55,11.551)
  other v1: 84.55,17.23
SD-DET: R23.1 TF1.9 | length 2.6
  Top Layer w0.2: R23.1@72.349,82.534 72.53,82.714 TF1.9@72.53,85.081
SPK+: J6.1 U7.5 | length 9
  Top Layer w0.45: J6.1@2.6,17.003 4.09,18.493 9.15,18.493 9.75,17.892 10.725,17.892 U7.5@10.735,17.883
SPK-: J6.2 U7.8 | length 9.1
  Top Layer w0.45: J6.2@2.6,14.503 4.01,13.093 8.54,13.093 9.52,14.073 U7.8@10.735,14.073
UDM: J2.11 R48.1 | length 16.8
  Top Layer w0.2: J2.11@23.1,93.34 24.046,92.394 24.046,84.752 25.02,83.778 31.092,83.778 R48.1@31.386,84.072
UDP: J2.12 R49.1 R57.2 | length 15.7
  Top Layer w0.2: J2.12@23.1,90.8 23.1,90.704 23.666,90.138 23.666,84.595 24.863,83.398 31.14,83.398 R49.1@31.386,83.152 R57.2@31.386,82.224
V33: C46.2 EC1.1 J7.2 R38.2 R39.2 U6.3 | length 121
  Top Layer w0.6: EC1.1@72.756,76.816 73.056,76.816 v2(73.833,76.039) ; v2(78.282,22.933) 78.687,22.528 82.036,22.528 R38.2@83.364,23.856
  Top Layer w1: J7.2@53.58,93.34 55.102,91.818 55.102,76.184 55.687,75.598 R39.2@67.049,75.599 ; R39.2@67.049,75.599 71.36,75.599 72.577,76.816 EC1.1@72.756,76.816 ; EC1.1@72.906,76.966 EC1.1@72.906,77.916 79.817,77.916 U6.3@79.967,78.066 ; U6.3@79.967,72.316 U6.3@79.967,78.066 ; U6.3@80.017,78.116 U6.3@79.967,78.066
  Bottom Layer w0.6: v2(73.833,76.039) 78.405,76.039 79.967,74.478 79.967,55.997 72.62,48.65 72.62,48.153 77.715,43.058 77.715,23.5 v2(78.282,22.933)
VDD33: C39.2 LCD1.2 LCD1.35 R10.1 R27.2 R39.1 U5.8 | length 147.9
  Top Layer w0.3: U5.8@3.249,40.749 3.249,39.751 3.66,39.339 7.787,39.339 8.274,39.825 8.274,43.457 7.886,43.845 R10.1@6.782,43.845
  Top Layer w0.5: U5.8@3.249,40.749 3.249,41.948 C39.2@3.243,41.954 2.164,41.954 1.872,41.661 1.872,31.108 2.437,30.542 v2(11.568,30.542) v2(11.568,75.521)
  Top Layer w0.6: v3(57.489,77.198) 57.533,77.198 57.941,76.791 66.74,76.791 66.748,76.799 R39.1@67.049,76.799 R39.1@67.063,76.799 ; R27.2@67.05,80.295 67.063,80.295 R39.1@67.063,76.799 ; R39.1@67.063,76.791 R39.1@67.063,76.799
  Bottom Layer w0.5: v2(11.568,30.542) 17.129,30.542 LCD1.35@19,32.413 ; v2(11.568,75.521) 11.587,75.54 16.407,75.54 LCD1.2@16.46,75.593
  Bottom Layer w0.8: LCD1.2@16.46,75.593 18.066,77.198 v3(57.489,77.198)
VIN: C57.2 C58.1 D13.1 F1.2 J5.A4 J5.A9 J5.B4 J5.B9 J10.A4 J10.A9 J10.B4 J10.B9 U10.3 | length 74.7
  Top Layer w0.3: F1.2@88.373,70.02 F1.2@88.466,70.02 ; 90.457,83.131 90.724,82.864 J10.B4@92.653,82.864 ; v1(90.76,83.28) 91.319,83.28 91.435,83.164 J10.A9@92.653,83.164 ; v1@91.285,78.52 91.431,78.374 J10.B9@92.653,78.374 ; 91.386,78.072 91.388,78.074 J10.A4@92.653,78.074 ; J5.B4@92.653,69.324 88.985,69.324 88.816,69.493 88.816,69.67 F1.2@88.466,70.02 ; J5.A9@92.653,69.624 89.069,69.624 88.673,70.02 F1.2@88.466,70.02
  Top Layer w0.5: v2(78.471,88.342) 78.471,87.806 C57.2@78.452,87.786 79.475,87.786 79.56,87.871 C58.1@79.66,87.871 79.76,87.871 79.81,87.921 79.81,87.993 80.103,88.286 U10.3@81.993,88.286
  Bottom Layer w0.3: v1(90.648,78.614) 86.801,78.614 86.071,77.885 86.071,70.577 86.839,69.81 v1(90.67,69.81) ; v1@91.06,64.718 91.081,64.739 v1(91.081,69.419) ; v1(91.135,82.812) 91.135,82.757 91.358,82.534 v1(91.358,78.614)
  Bottom Layer w0.5: v2(78.471,88.342) 78.471,92.966 79.635,94.129 90.396,94.129 91.058,93.467 91.058,83.578 v1(90.76,83.28)
  other v1: 90.82,64.705 91.549,64.719 91.161,65.238 91.475,69.81 90.992,78.187 90.416,82.805
VLED: C51.2 C52.2 D6.2 Q1.2 R46.2 R91.2 | length 9.5
  Top Layer w0.5: D6.2@67.35,67.75 67.55,67.75 67.95,67.35 67.95,65.66 C52.2@67.95,63.93 68.05,63.93 68.165,63.815 R46.2@69.15,63.815
  Top Layer w0.8: Q1.2@65.631,67.721 65.689,67.664 65.689,66.129 66.157,65.66 C51.2@67.93,65.66
pads on no net: J5.0 J5.A8 J5.B8 J10.0 J10.A8 J10.B8 RF1.2@94.325,40.752 U1.1 U1.61 U1.80 U9.2 U9.3 U9.11 U9.12 U9.13 U9.14 U9.16 U9.17 U9.20

## Polygon pours and split planes (outlines as drawn)
GND on Top Layer "g" (solid, remove dead copper, pour order 0): 0,100 0,0.6 0.6,0 98.9,0 100,1.1 100,98.9 98.9,100
GND on Bottom Layer "g" (solid, remove dead copper, pour order 1): 0,100 0,0.6 0.6,0 98.9,0 100,1.1 100,98.9 98.9,100

## Keep-outs
Keep-Out Layer:
  circle w0.1: c95,5.003 r1.5
  circle w0.1: c5,5.003 r1.5
  circle w0.1: c5,95.003 r1.5
  circle w0.1: c95,95.003 r1.5
  pour cut-out: 99.998,55.828 94.1,55.828 94.1,0.11 93.991,0.002 97.999,0.002 100,2.003
  lines w0.1: 97.999,0.002 100,0.002 100,-4.997 0,-4.997 0,0.003 ; 0,0.003 2,0.003 ; 0,0.003 2,0.003 ; 0.001,100.002 2.001,100.002 0.001,100.002 ; 0.001,100.002 0.001,105.002 100.001,105.002 100.001,100.003 98,100.003 ; 2,0.003 cw(c2,2.003) 0,2.003 0,98.003 cw(c2,98.003) 2,100.003 98,100.003 ; 2,0.003 98,0.003 ccw(c98,2.003) 100,2.003 100,98.003 ccw(c98,98.003) 98,100.003

## Other copper
Top Layer:
  pour cut-out: 72.99,65.68 72.99,65.58 73.094,65.476 76.446,65.476 76.78,65.81 76.78,70.4 76.72,70.46 74.29,70.46
  region net V33: 72.906,76.966 76.501,76.966 76.9,76.567 76.9,74.25 78.495,74.25 78.91,73.836 78.91,70.51 80.25,70.51 81.1,71.36 81.1,73.9 81.9,74.7 83.504,74.7 83.504,79.364 83.131,79.737 72.161,79.737 72.161,76.972 72.169,76.964
  region net +5VI: 75.506,65.674 78.424,65.674 79.44,66.691 83.601,66.691 83.601,72.041 83.956,72.396 90.297,72.396 90.297,74.268 90.291,74.273 82,74.273 81.504,73.777 81.504,71.116 80.587,70.2 75.5,70.2
  region net VIN: 93.128,64.396 90.524,64.396 90.524,65.508 91.444,65.508 91.982,64.97 93.102,64.97 93.126,64.946
  region net VLED: 64.95,68.29 64.95,65.801 65.748,65.003 67.787,65.003 67.787,68.29
  region net VIN: 92.905,69.186 87.484,69.186 87.44,69.23 87.44,70.64 89.31,70.64 89.31,70.641 89.31,70.211 89.449,70.072 91.633,70.072 92,69.705 92.904,69.705
  region net VIN: 93.104,82.74 91.69,82.74 91.447,82.496 90.12,82.496 90.12,83.324 90.377,83.581 91.371,83.581 91.642,83.31 93.099,83.31
  region net VIN: 93.019,77.92 90.392,77.92 90.367,77.945 90.367,78.792 90.459,78.884 91.582,78.884 91.957,78.508 93.018,78.508
  region net GND: 94.1,39.485 94.1,42.115 94.108,42.123 93.558,42.123 93.484,42.05 93.484,39.502 93.495,39.492
  pour cut-out: 94.323,38.002 84.425,38.002 84.425,38.957 84.77,39.302 94.326,39.302 94.327,39.301
  region net VLED: 66.612,68.291 66.612,67.191 67.212,66.591 67.212,63.491 69.412,63.491 69.412,64.191 68.612,64.191 68.412,64.391 68.412,68.291
  region net NetD6_1: 69.89,67.18 69.89,68.58 71.56,70.25 74.62,70.25 74.69,70.18 74.69,65.68 72.99,65.68 72.89,65.58 72.89,64.38 71.49,64.38 71.49,66.58 70.89,67.18
Bottom Layer:
  region net VIN: 90.524,64.396 91.826,64.396 91.826,69.879 91.495,70.211 87.099,70.211 86.546,70.764 86.546,77.568 86.896,77.919 91.211,77.919 91.77,78.478 91.77,83.183 91.1,83.852 91.1,84.066 90.861,84.066 90.12,83.324 90.12,83.323 90.12,82.496 90.783,82.496 90.946,82.334 90.946,79.371 90.459,78.884 86.433,78.884 85.57,78.02 85.57,70.308 86.584,69.293 90.353,69.293 90.712,68.934 90.712,65.695 90.524,65.508
  region net GND: 94.1,39.335 94.1,42.045 93.747,42.398 93.389,42.04 93.389,39.448 93.484,39.352

## Silkscreen, mask and mechanical layers (free items; w line width, h text height)
Top Overlay:
  circle w0.1: c95,5.003 r2.25
  circle w0.1: c5,5.003 r2.25
  circle w0.1: c5,95.003 r2.25
  circle w0.1: c95,95.003 r2.25
  rectangle: 57.278,98.536 74.121,100.083
  rectangle: 98.473,74.7 100.016,86.127
  rectangle: 56.654,25.785 64.654,33.785
  lines w0.2: 20.23,31.143 25.23,31.143 ccw(c25.23,32.413) 26.5,32.413 26.5,47.64 ccw(c25.23,47.64) 25.23,48.91 20.29,48.91 ccw(c20.29,48.88) 20.26,48.88 ; 20.23,54.003 24.643,54.003 ccw(c24.645,54.003) 24.645,54 25.67,54 ccw(c25.67,54.85) 26.52,54.85 26.52,75.69 ccw(c25.347,75.69) 25.347,76.863 24.257,76.863 20.23,76.863 ; 45.896,85.253 45.896,83.224 ccw(c46.692,83.224) 46.692,82.428 52.694,82.428 ccw(c52.694,83.335) 53.6,83.335 53.6,86.164 ; 77.01,100.002 77.01,80.971 ccw(c78.139,80.971) 78.139,79.842 83.426,79.842 87.207,79.842 cw(c87.207,78.572) 88.477,78.572 88.477,74.818 ccw(c89.747,74.818) 89.747,73.548 99.998,73.548 92.499,73.548
  text "PB5" at 80.196,97.625 h0.9
  text "RX" at 89.151,97.612 h0.9
  text "V33" at 54.1,95.16 h1 r90
  text "PA11" at 10.882,95.099 h1 r90
  text "PA10" at 13.43,95.099 h1 r90
  text "PA7" at 15.978,95.099 h1 r90
  text "PA5" at 21.073,95.099 h1 r90
  text "UDM" at 23.621,95.099 h1 r90
  text "PB15" at 26.168,95.099 h1 r90
  text "PB13" at 28.716,95.099 h1 r90
  text "PB11" at 31.264,95.099 h1 r90
  text "PB9" at 33.812,95.099 h1 r90
  text "PB7" at 36.359,95.099 h1 r90
  text "PB5" at 38.907,95.099 h1 r90
  text "PB3" at 41.455,95.099 h1 r90
  text "PB1" at 44.002,95.099 h1 r90
  text "PA15" at 46.55,95.099 h1 r90
  text "PA13" at 49.098,95.099 h1 r90
  text "PA11" at 51.645,95.099 h1 r90
  text "PB4" at 80.196,95.079 h0.9
  text "TX" at 89.151,95.07 h0.9
  text "485TX" at 18.55,94.99 h1 r90
  text "PB10" at 80.196,92.532 h0.9
  text "SWDC" at 89.151,92.528 h0.9
  text "DEBUG" at 96.894,91.209 h1 r270
  text "PB11" at 80.196,89.985 h0.9
  text "SWDO" at 89.151,89.985 h0.9
  text "GND" at 54.05,86.52 h1 r90
  text "PA4" at 21.055,86.42 h1 r90
  text "UDP" at 23.6,86.42 h1 r90
  text "PB8" at 33.78,86.42 h1 r90
  text "PB6" at 36.325,86.42 h1 r90
  text "PB4" at 38.87,86.42 h1 r90
  text "PB0" at 41.415,86.42 h1 r90
  text "GND" at 43.96,86.42 h1 r90
  text "PA10" at 51.588,85.646 h1 r90
  text "PB14" at 26.145,85.586 h1 r90
  text "PB12" at 28.69,85.586 h1 r90
  text "PB10" at 31.235,85.586 h1 r90
  text "PA14" at 46.505,85.586 h1 r90
  text "PA12" at 49.05,85.586 h1 r90
  text "CANTX" at 10.875,84.42 h1 r90
  text "CANRX" at 13.42,84.42 h1 r90
  text "485EN" at 15.965,84.42 h1 r90
  text "485RX" at 18.51,84.42 h1 r90
  text "WIFI接口" at 46.16,83.034 h2
  text "3V3" at 11.847,75.062 h2
  text "GND" at 20.78,75.031 h2
  text "DAPLink" at 89.774,73.792 h2.5
  text "A14" at 11.775,72.525 h2
  text "B0" at 20.78,72.479 h2
  text "A15" at 11.761,69.968 h2
  text "B1" at 20.78,69.948 h2
  text "A12" at 11.783,67.431 h2
  text "D0" at 20.78,67.396 h2
  text "CAN" at 2.526,65.092 h2
  text "L CAN H" at 7.96,64.941 h2 r270
  text "D1" at 13.052,64.894 h2
  text "D2" at 20.78,64.864 h2
  text "D3" at 12.806,62.335 h2
  text "D4" at 20.78,62.337 h2
  text "USBOTG" at 93.67,60.29 h1
  text "D6" at 20.78,59.785 h2
  text "D5" at 12.796,59.781 h2
  text "摄像头接口" at 25.575,59.652 h2.5 r90
  text "A" at 7.986,57.343 h2 r270
  text "D7" at 12.806,57.249 h2
  text "D8" at 20.78,57.233 h2
  text "PP4" at 11.715,54.716 h2
  text "B3" at 20.78,54.68 h2
  text "GND" at 11.09,52.14 h2
  text "LEDA" at 20.78,52.153 h2
  text "GNDx8" at 91.74,51.54 h1 r90
  text "B" at 8.033,51.479 h2 r270
  text "B7" at 20.78,49.626 h2
  text "B6" at 12.897,49.582 h2
  text "RS485" at 1.496,48.767 h2
  text "D8" at 20.78,47.074 h2
  text "D9" at 12.803,47.025 h2
  text "FLASH" at 51.739,46.378 h2 r90
  text "B8" at 20.78,44.522 h2
  text "B9" at 12.894,44.467 h2
  text "B10" at 20.78,41.97 h2
  text "B11" at 12.15,41.93 h2
  text "D14" at 20.78,39.439 h2
  text "D15" at 11.801,39.372 h2
  text "D12" at 20.78,36.908 h2
  text "D13" at 11.811,36.813 h2
  text "QSPI屏接口" at 25.814,34.39 h2.5 r90
  text "D10" at 20.78,34.356 h2
  text "扫码关注" at 56.747,34.356 h2
  text "D11" at 12.058,34.277 h2
  text "3V3" at 20.78,31.802 h2
  text "GND" at 11.09,31.701 h2
  text "LCD" at 16.03,29.46 h1.2
  text "AUDIO-PA" at 7.899,19.194 h2
  text "FR3068E-C DEV1.4" at 34.89,18.343 h4.5
  text "-SPK+" at 7.32,13.273 h1 r90
  text "AMIC" at 72.15,12.581 h2
  text "GND" at 11.829,9.815 h1 r90
  text "PC1" at 14.369,9.815 h1 r90
  text "PC3" at 16.909,9.815 h1 r90
  text "PC5" at 19.449,9.815 h1 r90
  text "PC7" at 21.989,9.815 h1 r90
  text "PD1" at 24.529,9.815 h1 r90
  text "PD3" at 27.069,9.815 h1 r90
  text "PD5" at 29.609,9.815 h1 r90
  text "PD7" at 32.149,9.815 h1 r90
  text "PD9" at 34.689,9.815 h1 r90
  text "PD11" at 37.229,9.815 h1 r90
  text "PD13" at 39.769,9.815 h1 r90
  text "PD15" at 42.309,9.815 h1 r90
  text "PP5" at 44.849,9.815 h1 r90
  text "PP7" at 47.389,9.815 h1 r90
  text "PP3" at 49.929,9.815 h1 r90
  text "PA4" at 52.469,9.815 h1 r90
  text "PA6" at 55.009,9.815 h1 r90
  text "D4" at 64.087,9.388 h1
  text "D3" at 64.117,8.001 h1
  text "RST" at 86.38,5.923 h1
  text "K1" at 61.76,5.893 h1
  text "K2" at 69.923,5.893 h1
  text "K3" at 78.42,5.893 h1
  text "PC0" at 11.827,0.524 h1 r90
  text "PC2" at 14.367,0.524 h1 r90
  text "PC4" at 16.907,0.524 h1 r90
  text "PC6" at 19.447,0.524 h1 r90
  text "PD0" at 21.987,0.524 h1 r90
  text "PD2" at 24.527,0.524 h1 r90
  text "PD4" at 27.067,0.524 h1 r90
  text "PD6" at 29.607,0.524 h1 r90
  text "PD8" at 32.147,0.524 h1 r90
  text "PD10" at 34.687,0.524 h1 r90
  text "PD12" at 37.227,0.524 h1 r90
  text "PD14" at 39.767,0.524 h1 r90
  text "PP4" at 42.307,0.524 h1 r90
  text "PP6" at 44.847,0.524 h1 r90
  text "PP0" at 47.387,0.524 h1 r90
  text "PP2" at 49.927,0.524 h1 r90
  text "PA5" at 52.467,0.524 h1 r90
  text "PA7" at 55.007,0.524 h1 r90
Top Solder:
  rectangle: 87.977,41.18 89.68,45.419
Mechanical 1:
  drawing of 173 lines, arcs and shapes, not listed